# Altium PCB nrf_400708.PcbDoc (part 3 of 6)
Units mm, origin at the board's own origin, x right, y up, seen from the top; angles counter-clockwise.
Board outline 117 x 63.5 mm, 4 copper layers (Top Layer, Mid-Layer 1, Mid-Layer 2, Bottom Layer), stack 1.556 mm thick; 226 components, 168 nets, 912 pads, 2002 vias.
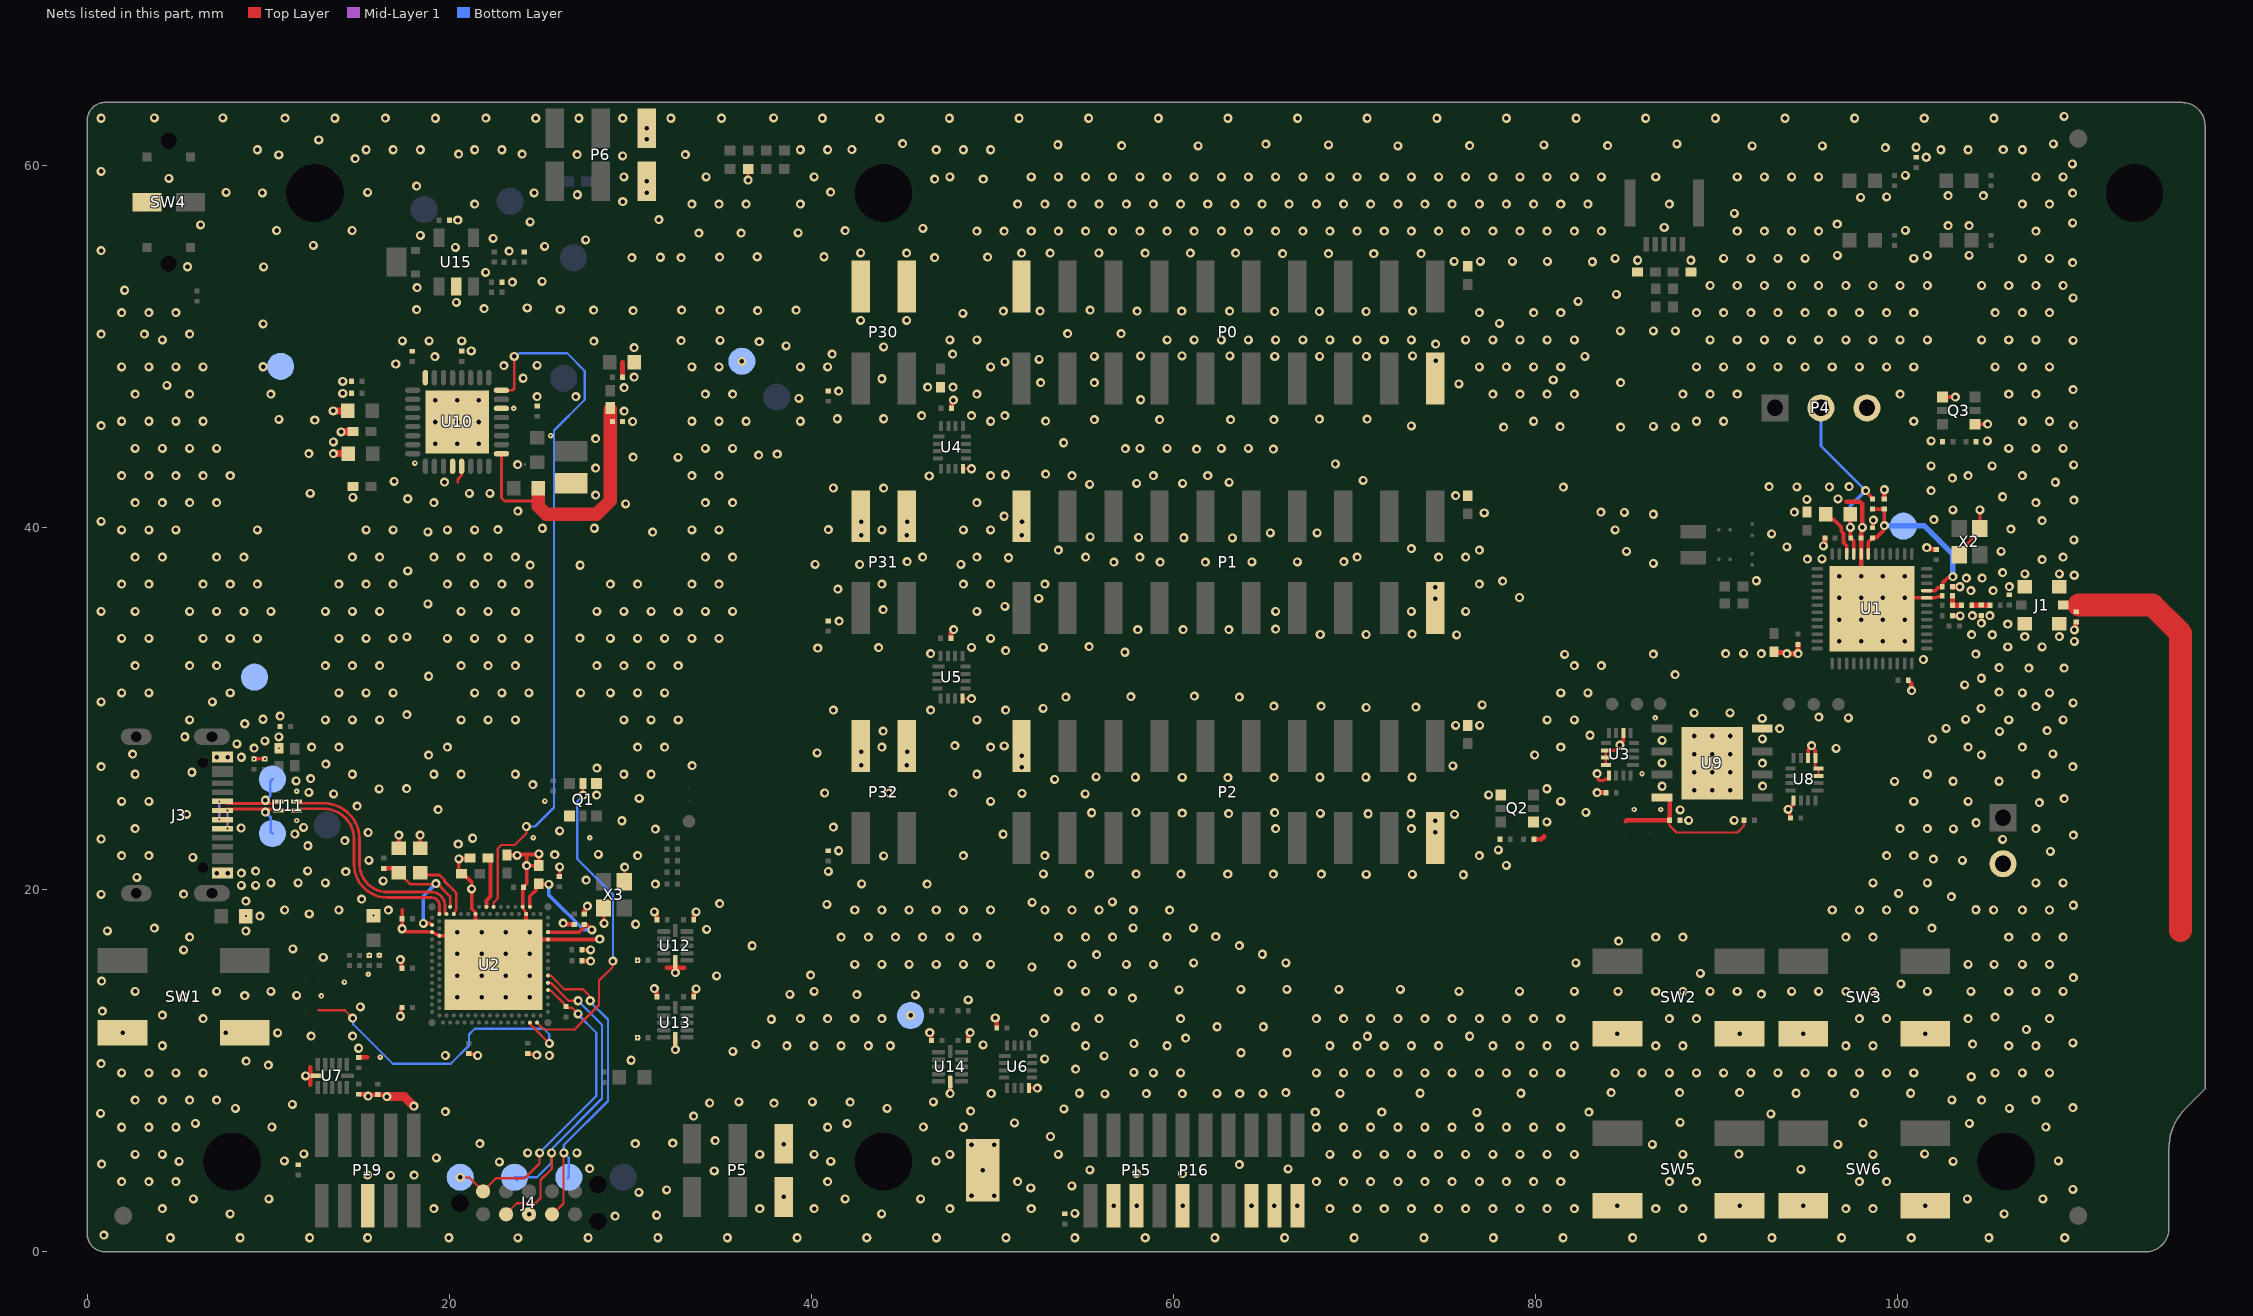
[diagram p4: the nets of this part, all layers, seen from the top]

## Part data (continued)
L3 L4: library part L0201-3n5-HQ-Murata, "Inductor, 500mA, ±0.1ｎH, 170mOhm", Manufacturer=Murata, Manufacturer Part Number=LQP03HQ3N5B02, Part number IPS=N.A., Part number NEMS=100300222, Supplier Part Number 1=490-13925-1-ND, Artikkelnr Noca=N.A., Author=rsk, Component Class=Inductors, Component Status=Active, ComponentLink1Description=Datasheet, ComponentLink1URL=https://search.murata.co.jp/Ceramy/image/img/P02/JELF243C-0021.pdf, ComponentLink2Description="Supplier link", ComponentLink2URL=N.A., Footprint Doc=0201, HelpURL=https://psearch.en.murata.com/inductor/product/LQP03HQ3N5B02%23.html, LatestRevisionDate=2018-10-23, Note="-55°C ~ 125°C", Pad Count=2, Part Number=L0201-3n5-HQ-Murata, Part number Norautron=N.A., PartId=100300222, Published=2018-10-23, Supplier 1=Digi-Key, Supplier 2=N.A., Supplier Part Number 2=N.A.
L8: library part L0806-2µ2-2500mA-73mOhm-CIGT201610EH2R2MNE, "Inductor, Irms=2.5A, Isat=2.9A, ±20%, DCR=73mΩ", Manufacturer="Samsung Electro-Mechanics America", Manufacturer Part Number=CIGT201610EH2R2MNE, Part number IPS=N.A., Part number NEMS=100300400, Part number Norautron=26521789, Supplier Part Number 1=1276-6901-1-ND, Artikkelnr Noca=N.A., Author=rsk, Component Class=Inductors, Component Status=Active, ComponentLink1Description=Datasheet, ComponentLink1URL=https://media.digikey.com/pdf/Data%20Sheets/Samsung%20PDFs/CIGT201610EH2R2MNE_Spec.pdf, ComponentLink2Description="Supplier link", ComponentLink2URL=https://www.digikey.com/en/products/detail/samsung-electro-mechanics/CIGT201610EH2R2MNE/7041223?s=N4IgTCBcDaIMIEkDiAVMAGAjANk%2BgogBJgBKYAsgHL4gC6AvkA, Footprint Doc=0806, HelpURL=http://product.samsungsem.com/pi/CIGT201610EH2R2MN.do, LatestRevisionDate=2022-09-07, Note="Unshielded Thin Film Inductor", Pad Count=2, Part Number=L0806-2µ2-2500mA-73mOhm-CIGT201610EH2R2MNE, PartId=100300400, Published=2021-02-03, Supplier 1=Digi-Key, Supplier 2=Mouser, Supplier Part Number 2=187-CIGT201610EH2R2M
LABEL1: library part Label_12x12, "PCA version label, stick-on, 12x12mm", Manufacturer="Ellco Etikett", Manufacturer Part Number=A33512‐01, Part number IPS=N.A., Part number NEMS=101200028, Artikkelnr Noca=N.A., Author=hany, Component Class=Mechanicals, Component Status=Active, ComponentLink1Description=Datasheet, ComponentLink1URL=N.A., ComponentLink2Description="Supplier link", ComponentLink2URL=N.A., Footprint Doc=Label, HelpURL=N.A., LatestRevisionDate=2023-01-05, Note=N.A., Pad Count=0, Part Number=Label_12x12, Part number Norautron=N.A., PartId=101200028, Published=2023-01-05, Supplier 1=N.A., Supplier 2=N.A., Supplier Part Number 1=N.A., Supplier Part Number 2=N.A.
LD1 LD2 LD3 LD4 LD5: library part "VS 25C7M5", "LED, Green, 0603, 573nm, Vf=2.0V, 24mcd, - 40 to +85°C", Manufacturer="Victory Electronics", Part number IPS="00000001274, 00000009961", Part number NEMS=101400097, Part number Norautron=26313411, Supplier Part Number 1=N.A., Artikkelnr Noca=13019193, Author=rsk, Component Class=Optoelectronics, Component Status=Active, ComponentLink1Description=Datasheet, ComponentLink1URL=N.A., ComponentLink2Description="Supplier link", ComponentLink2URL=N.A., Footprint Doc=0603, HelpURL="\\hizz\pro\app9717\Datasheet\optoelectronics\Victory Electronics\VS 25C7M5.pdf", LatestRevisionDate=2020-10-23, Manufacturer Part Number="VS 25C7M5", Note=N.A., Pad Count=2, Part Number="VS 25C7M5", PartId=101400097, Published=2017-08-21, Supplier 1="EC Partner", Supplier 2=N.A., Supplier Part Number 2=N.A.
LOGO1: library part "Nordic Logo lying", "Nordic logo lying", Manufacturer=N.A., Part number NEMS=101100001, Artikkelnr Noca=N.A., Author=rsk, Component Class=Markings, Component Status=Active, ComponentLink1Description=Datasheet, ComponentLink1URL=N.A., ComponentLink2Description="Supplier link", ComponentLink2URL=N.A., Footprint Doc="Nordic Logo", HelpURL=N.A., LatestRevisionDate=2017-03-20, Manufacturer Part Number=N.A., Note=N.A., Pad Count=0, Part Number="Nordic Logo lying", Part number IPS=N.A., Part number Norautron=N.A., PartId=101100001, Published=2017-09-01, Supplier 1=N.A., Supplier 2=N.A., Supplier Part Number 1=N.A., Supplier Part Number 2=N.A.
LOGO2: library part "WEEE Symbol 3x4.5mm", "WEEE Directive symbol", Manufacturer=N.A., Part number NEMS=101100006, Artikkelnr Noca=N.A., Author=rsk, Component Class=Markings, Component Status=Active, ComponentLink1Description=Datasheet, ComponentLink1URL=N.A., ComponentLink2Description="Supplier link", ComponentLink2URL=N.A., Footprint Doc=WEE_3x4.5mm, HelpURL=N.A., LatestRevisionDate=2023-03-07, Manufacturer Part Number=N.A., Note=N.A., Pad Count=0, Part Number="WEEE Symbol 3x4.5mm", Part number IPS=N.A., Part number Norautron=N.A., PartId=101100006, Published=2016-09-07, Supplier 1=N.A., Supplier 2=N.A., Supplier Part Number 1=N.A., Supplier Part Number 2=N.A.
LOGO3: "Segger logo, small size", Manufacturer=N.A., Part number NEMS=101100004, Artikkelnr Noca=N.A., Author=rsk, Component Class=Markings, Component Status=Active, ComponentLink1Description=Datasheet, ComponentLink1URL=N.A., ComponentLink2Description="Supplier link", ComponentLink2URL=N.A., Footprint Doc="Segger Logo S", HelpURL=N.A., LatestRevisionDate=2016-09-07, Manufacturer Part Number=N.A., Note=N.A., Pad Count=0, Part Number="Segger Logo S", Part number IPS=N.A., Part number Norautron=N.A., PartId=101100004, Published=2016-09-07, Supplier 1=N.A., Supplier 2=N.A., Supplier Part Number 1=N.A., Supplier Part Number 2=N.A.
LOGO4: library part CE_logo, "CE (Conformité_Européenne) logo", Manufacturer=N.A., Part number NEMS=101100010, Artikkelnr Noca=N.A., Author=daba, Component Class=Markings, Component Status=Active, ComponentLink1Description=Datasheet, ComponentLink1URL=N.A., ComponentLink2Description="Supplier link", ComponentLink2URL=N.A., Footprint Doc=CE_logo, HelpURL=N.A., LatestRevisionDate=2024-11-26, Manufacturer Part Number=N.A., Note=N.A., Pad Count=0, Part Number=CE_logo, Part number IPS=N.A., Part number Norautron=N.A., PartId=101100010, Published=2024-11-26, Supplier 1=N.A., Supplier 2=N.A., Supplier Part Number 1=N.A., Supplier Part Number 2=N.A.
NT2: library part "2 pin starpoint", "Starpoint", Manufacturer=N.A., Part number NEMS=100500603, Artikkelnr Noca=N.A., Author=rsk, Component Class=Connectors, Component Status=Active, ComponentLink1Description=Datasheet, ComponentLink1URL=N.A., ComponentLink2Description="Supplier link", ComponentLink2URL=N.A., Footprint Doc=N.A., HelpURL=N.A., LatestRevisionDate=2017-08-31, Manufacturer Part Number=N.A., Note="Net tie", Pad Count=2, Part Number="2 pin starpoint", Part number IPS=N.A., Part number Norautron=N.A., PartId=100500603, Published=2017-08-31, Supplier 1=N.A., Supplier 2=N.A., Supplier Part Number 1=N.A., Supplier Part Number 2=N.A., System=Connector
P0 P1 P2: library part "Pin Header 2x10 SMD, 2.54mm", "Pin Header 2x10, 2.54mm (100mil) SMD", Manufacturer=WCON, Manufacturer Part Number=1125-1210S0M116CR09, Part number IPS=N.A., Part number NEMS=100500738, Artikkelnr Noca=N.A., Author=stl1, Component Class=Connectors, Component Status=Active, ComponentLink1Description=Datasheet, ComponentLink1URL=https://suddendocs.samtec.com/catalog_english/tsm.pdf, ComponentLink2Description="Supplier link", ComponentLink2URL=https://www.digikey.no/en/products/detail/samtec-inc/TSM-110-02-S-DV/6679037, Footprint Doc=HDR_2x10-SMD-2.54MM, HelpURL=https://www.samtec.com/products/tsm-110-02-s-dv, LatestRevisionDate=2024-02-21, Note=SMD, Pad Count=20, Part Number="Pin Header 2x10 SMD, 2.54mm", Part number Norautron=N.A., PartId=100500738, Published=2022-01-24, Supplier 1=Cabcon, Supplier 2=Samtec, Supplier Part Number 1=1125-1210S0M116CR09, Supplier Part Number 2=TSM-110-02-S-DV, System=Connector
P3: "Pin List 1x2, 2.54mm (100mil)", Manufacturer=N.A., Part number NEMS=100500297, Artikkelnr Noca=56019040, Author=rsk, Component Class=Connectors, Component Status=Active, ComponentLink1Description=Datasheet, ComponentLink1URL=N.A., ComponentLink2Description="Supplier link", ComponentLink2URL=N.A., Footprint Doc=LIST_1x2, HelpURL=N.A., LatestRevisionDate=2009-12-12, Manufacturer Part Number=N.A., Note=N.A., Pad Count=2, Part Number="Pin List 1x2", Part number IPS=N.A., Part number Norautron=N.A., PartId=100500297, Published=2009-12-12, Supplier 1=N.A., Supplier 2=N.A., Supplier Part Number 1=N.A., Supplier Part Number 2=N.A., System=Connector
P4: "Pin List 1x3, 2.54mm (100mil)", Manufacturer=N.A., Part number NEMS=100500304, Artikkelnr Noca=56019041, Author=rsk, Component Class=Connectors, Component Status=Active, ComponentLink1Description=Datasheet, ComponentLink1URL=N.A., ComponentLink2Description="Supplier link", ComponentLink2URL=N.A., Footprint Doc=LIST_1x3, HelpURL=N.A., LatestRevisionDate=2009-12-12, Manufacturer Part Number=N.A., Note=N.A., Pad Count=3, Part Number="Pin List 1x3", Part number IPS=N.A., Part number Norautron=N.A., PartId=100500304, Published=2009-12-12, Supplier 1=N.A., Supplier 2=N.A., Supplier Part Number 1=N.A., Supplier Part Number 2=N.A., System=Connector
P5 P6: library part "Pin List 1x3 SMD", "Pin List 1x3, 2.54mm (100mil), SMD", Manufacturer=WCON, Manufacturer Part Number=1125-1103S0M116CR04, Part number IPS=N.A., Part number NEMS=100500306, Part number Norautron=26470016, Artikkelnr Noca=N.A., Author=rsk, Component Class=Connectors, Component Status=Active, ComponentLink1Description=Datasheet, ComponentLink1URL=N.A., ComponentLink2Description="Supplier link", ComponentLink2URL=N.A., Footprint Doc=LIST_1x3_SMD, HelpURL=N.A., LatestRevisionDate=2021-09-24, Note=N.A., Pad Count=3, Part Number="Pin List 1x3 SMD", PartId=100500306, Published=2013-10-21, Supplier 1=Cabcon, Supplier 2=Samtec, Supplier Part Number 1=1125-1103S0M116CR04, Supplier Part Number 2=TSM-103-01-L-SV-P-TR, System=Connector
P15 P19: library part "Pin Header 2x5 SMD, 1.27mm, KS", "Pin Header 2x5, 1.27mm (50mil), SMD, Keying Shroud", Manufacturer=WCON, Manufacturer Part Number=3132-10MS0BK00R5, Part number IPS=N.A., Part number NEMS=100500261, Artikkelnr Noca=N.A., Author=rsk, Component Class=Connectors, Component Status=Active, ComponentLink1Description=Datasheet, ComponentLink1URL=N.A., ComponentLink2Description="Supplier link", ComponentLink2URL=N.A., Footprint Doc=HDR_2x5-SMD-1.27mm, HelpURL=\\hizz\pro\app9717\Datasheet\connectors\W-CON\3132-XXMXXBK00XX.pdf, LatestRevisionDate=2024-02-02, Note="(Replaced 3132-10MS0BK00R1)", Pad Count=10, Part Number="Pin Header 2x5 SMD, 1.27mm, KS", Part number Norautron=N.A., PartId=100500261, Published=2016-01-22, Supplier 1=Cabcon, Supplier 2=N.A., Supplier Part Number 1=3132-10MS0BK00R5, Supplier Part Number 2=N.A., System=Connector
P16: library part "Pin Header 2x10 SMD, 1.27mm, KS, N.C.", "Pin Header 2x10, 1.27mm (50mil), SMD, Keying Shroud", Manufacturer=WCON, Manufacturer Part Number=3132-20MS0BK00R1, Part number IPS=N.A., Part number NEMS=100500279, Artikkelnr Noca=N.A., Author=rsk, Component Class=Connectors, Component Status=Active, ComponentLink1Description=Datasheet, ComponentLink1URL=N.A., ComponentLink2Description="Supplier link", ComponentLink2URL=N.A., Footprint Doc=HDR_2x10-SMD-1.27mm, HelpURL=N.A., LatestRevisionDate=2017-10-23, Note=N.A., Pad Count=20, Part Number="Pin Header 2x10 SMD, 1.27mm, KS, N.C.", Part number Norautron=N.A., PartId=100500279, Published=2017-09-07, Supplier 1=Cabcon, Supplier 2=Digi-Key, Supplier Part Number 1=3132-20MS0BK00R1, Supplier Part Number 2=FTSH-110-01-F-DV-K-ND, System=Connector
P30 P31 P32: "Pin Header 2x2, SMD, 2.54mm (100mil)", Manufacturer=WCON, Manufacturer Part Number=1125-1202S0M116CR03, Part number IPS=N.A., Part number NEMS=100500770, Artikkelnr Noca=N.A., Author=stl1, Component Class=Connectors, Component Status=Active, ComponentLink1Description=Datasheet, ComponentLink1URL=N.A., ComponentLink2Description="Supplier link", ComponentLink2URL=N.A., Footprint Doc=HDR_2x2-SMD, HelpURL=N.A., LatestRevisionDate=2024-02-21, Note=N.A., Pad Count=4, Part Number="Pin Header 2x2 SMD", Part number Norautron=N.A., PartId=100500770, Published=2022-10-28, Supplier 1=Cabcon, Supplier 2=Samtec, Supplier Part Number 1=1125-1202S0M116CR03, Supplier Part Number 2=TSM-102-02-S-DV, System=Connector
Q1 Q2 Q3: "MOSFET 2N-CH 60V 0.17A TSSOP6 (SOT363)", Manufacturer=Nexperia, Manufacturer Part Number=NX138AKSX, Part number IPS=N.A., Part number NEMS=101300207, Supplier Part Number 1=1727-2732-2-ND, Artikkelnr Noca=N.A., Author=stl1, Component Class=Semiconductors, Component Status=Active, ComponentLink1Description=Datasheet, ComponentLink1URL=https://assets.nexperia.com/documents/data-sheet/NX138AKS.pdf, ComponentLink2Description="Supplier link", ComponentLink2URL=N.A., Footprint Doc=TSSOP6, HelpURL=N.A., LatestRevisionDate=2023-11-20, Note=N.A., Pad Count=6, Part Number=NX138AKS, Part number Norautron=N.A., PartId=101300207, Published=2023-11-20, Supplier 1=Digi-Key, Supplier 2=Mouser, Supplier Part Number 2=771-NX138AKSX
Q4: library part PBSS4330PA,115, "30V, 3A, 2.1W, G=270, NPN Transistor", Manufacturer=Nexperia, Part number IPS=N.A., Part number NEMS=101300184, Supplier Part Number 1=1727-5112-1-ND‎, Artikkelnr Noca=N.A., Author=rubr, Component Class=Semiconductors, Component Status=Active, ComponentLink1Description=Datasheet, ComponentLink1URL=https://assets.nexperia.com/documents/data-sheet/PBSS4330PA.pdf, ComponentLink2Description="Supplier link", ComponentLink2URL=https://www.digikey.com/en/products/detail/nexperia-usa-inc/PBSS4330PA-115/2296330, Footprint Doc="HUSON-3 (2x2)", HelpURL=https://www.nexperia.com/products/bipolar-transistors/general-purpose-and-low-vcesat-bipolar-transistors/single-bipolar-transistors/single-bipolar-transistors-100-v/PBSS4330PA.html, LatestRevisionDate=2021-06-03, Manufacturer Part Number=PBSS4330PA,115, Note=N.A., Pad Count=3, Part Number=PBSS4330PA,115, Part number Norautron=N.A., PartId=101300184, Published=2021-06-03, Supplier 1=Digi-Key, Supplier 2=N.A., Supplier Part Number 2=N.A.
R1 R2 R19 R20: library part R0201-680, "Resistor, ±1%, 0.05W", Manufacturer=N.A., Part number NEMS=100100040, Artikkelnr Noca=N.A., Author=rsk, Component Class=Resistors, Component Status=Active, ComponentLink1Description=Datasheet, ComponentLink1URL=N.A., ComponentLink2Description="Supplier link", ComponentLink2URL=N.A., Footprint Doc=0201, HelpURL=N.A., LatestRevisionDate=2014-11-13, Manufacturer Part Number=N.A., Note="Chip Res 1%", Pad Count=2, Part Number=R0201-680, Part number IPS=N.A., Part number Norautron=N.A., PartId=100100040, Published=2014-11-13, Supplier 1=N.A., Supplier 2=N.A., Supplier Part Number 1=N.A., Supplier Part Number 2=N.A.
R3 R9 R38: library part R0201-0R, "Resistor, ±5%, 0.05W", Manufacturer=N.A., Part number IPS=00000003245, Part number NEMS=100100001, Artikkelnr Noca=N.A., Author=rsk, Component Class=Resistors, Component Status=Active, ComponentLink1Description=Datasheet, ComponentLink1URL=N.A., ComponentLink2Description="Supplier link", ComponentLink2URL=N.A., Footprint Doc=0201, HelpURL=N.A., LatestRevisionDate=2017-11-09, Manufacturer Part Number=N.A., Note="Chip Res 5%", Pad Count=2, Part Number=R0201-0R, Part number Norautron=N.A., PartId=100100001, Published=2014-11-13, Supplier 1=N.A., Supplier 2=N.A., Supplier Part Number 1=N.A., Supplier Part Number 2=N.A.
R4 R37 R41 R42: library part R0201-10k, "Resistor, ±1%, 0.05W", Manufacturer=N.A., Part number IPS=00000001255, Part number NEMS=100100065, Part number Norautron=26107101, Artikkelnr Noca=N.A., Author=rsk, Component Class=Resistors, Component Status=Active, ComponentLink1Description=Datasheet, ComponentLink1URL=N.A., ComponentLink2Description="Supplier link", ComponentLink2URL=N.A., Footprint Doc=0201, HelpURL=N.A., LatestRevisionDate=2014-11-13, Manufacturer Part Number=N.A., Note="Chip Res 1%", Pad Count=2, Part Number=R0201-10k, PartId=100100065, Published=2014-11-13, Supplier 1=N.A., Supplier 2=N.A., Supplier Part Number 1=N.A., Supplier Part Number 2=N.A.
R5: library part R0201-560, "Resistor, ±1%, 0.05W", Manufacturer=N.A., Part number NEMS=100100038, Artikkelnr Noca=N.A., Author=rsk, Component Class=Resistors, Component Status=Active, ComponentLink1Description=Datasheet, ComponentLink1URL=N.A., ComponentLink2Description="Supplier link", ComponentLink2URL=N.A., Footprint Doc=0201, HelpURL=N.A., LatestRevisionDate=2014-11-13, Manufacturer Part Number=N.A., Note="Chip Res 1%", Pad Count=2, Part Number=R0201-560, Part number IPS=N.A., Part number Norautron=N.A., PartId=100100038, Published=2014-11-13, Supplier 1=N.A., Supplier 2=N.A., Supplier Part Number 1=N.A., Supplier Part Number 2=N.A.
R6 R8 R13 R14 R15 R16 R17 R23 R31 R32 R35 R39 R56: library part R0201-100k, "Resistor, ±1%, 0.05W", Manufacturer=N.A., Part number IPS=00000001419, Part number NEMS=100100080, Part number Norautron=26108487, Artikkelnr Noca=N.A., Author=rsk, Component Class=Resistors, Component Status=Active, ComponentLink1Description=Datasheet, ComponentLink1URL=N.A., ComponentLink2Description="Supplier link", ComponentLink2URL=N.A., Footprint Doc=0201, HelpURL=N.A., LatestRevisionDate=2014-11-13, Manufacturer Part Number=N.A., Note="Chip Res 1%", Pad Count=2, Part Number=R0201-100k, PartId=100100080, Published=2014-11-13, Supplier 1=N.A., Supplier 2=N.A., Supplier Part Number 1=N.A., Supplier Part Number 2=N.A.
R7: library part R0201-47R, "Resistor, ±1%, 0.05W", Manufacturer=N.A., Part number IPS=00000004794, Part number NEMS=100100022, Part number Norautron=26108300, Artikkelnr Noca=N.A., Author=rsk, Component Class=Resistors, Component Status=Active, ComponentLink1Description=Datasheet, ComponentLink1URL=N.A., ComponentLink2Description="Supplier link", ComponentLink2URL=N.A., Footprint Doc=0201, HelpURL=N.A., LatestRevisionDate=2014-11-13, Manufacturer Part Number=N.A., Note="Chip Res 1%", Pad Count=2, Part Number=R0201-47R, PartId=100100022, Published=2014-11-13, Supplier 1=N.A., Supplier 2=N.A., Supplier Part Number 1=N.A., Supplier Part Number 2=N.A.
R10 R11 R12 R18 R27: library part R0201-1M0, "Resistor, ±1%, 0.05W", Manufacturer=N.A., Part number IPS=00000001418, Part number NEMS=100100093, Part number Norautron=26107108, Artikkelnr Noca=N.A., Author=rsk, Component Class=Resistors, Component Status=Active, ComponentLink1Description=Datasheet, ComponentLink1URL=N.A., ComponentLink2Description="Supplier link", ComponentLink2URL=N.A., Footprint Doc=0201, HelpURL=N.A., LatestRevisionDate=2014-11-13, Manufacturer Part Number=N.A., Note="Chip Res 1%", Pad Count=2, Part Number=R0201-1M0, PartId=100100093, Published=2014-11-13, Supplier 1=N.A., Supplier 2=N.A., Supplier Part Number 1=N.A., Supplier Part Number 2=N.A.
R21 R22 R25 R28 R29 R30 R33 R34: library part R0402-0R, "Resistor, ±5%, 0.063W", Manufacturer=N.A., Part number IPS=00000007128, Part number NEMS=100100109, Supplier Part Number 1=146-9661, Artikkelnr Noca=27049000, Author=rsk, Component Class=Resistors, Component Status=Active, ComponentLink1Description=Datasheet, ComponentLink1URL=N.A., ComponentLink2Description="Supplier link", ComponentLink2URL=N.A., Footprint Doc=0402, HelpURL=N.A., LatestRevisionDate=2009-11-23, Manufacturer Part Number=N.A., Note="Chip Res 5%", Pad Count=2, Part Number=R0402-0R, Part number Norautron=N.A., PartId=100100109, Published=2009-05-08, Supplier 1=Farnell, Supplier 2=N.A., Supplier Part Number 2=N.A.
R24: library part R0402-TBD, "Chip Res 0402", Manufacturer=N.A., Part number NEMS=100100282, Artikkelnr Noca=N.A., Author=rsk, Component Class=Resistors, Component Status=Active, ComponentLink1Description=Datasheet, ComponentLink1URL=N.A., ComponentLink2Description="Supplier link", ComponentLink2URL=N.A., Footprint Doc=0402, HelpURL=N.A., LatestRevisionDate=2010-12-21, Manufacturer Part Number=N.A., Note="Chip Res", Pad Count=2, Part Number=R0402-TBD, Part number IPS=N.A., Part number Norautron=N.A., PartId=100100282, Published=2010-12-21, Supplier 1=N.A., Supplier 2=N.A., Supplier Part Number 1=N.A., Supplier Part Number 2=N.A.
R26: library part R0201-47k, "Resistor, ±1%, 0.05W", Manufacturer=N.A., Part number IPS=00000001423, Part number NEMS=100100076, Artikkelnr Noca=N.A., Author=rsk, Component Class=Resistors, Component Status=Active, ComponentLink1Description=Datasheet, ComponentLink1URL=N.A., ComponentLink2Description="Supplier link", ComponentLink2URL=N.A., Footprint Doc=0201, HelpURL=N.A., LatestRevisionDate=2014-11-13, Manufacturer Part Number=N.A., Note="Chip Res 1%", Pad Count=2, Part Number=R0201-47k, Part number Norautron=N.A., PartId=100100076, Published=2014-11-13, Supplier 1=N.A., Supplier 2=N.A., Supplier Part Number 1=N.A., Supplier Part Number 2=N.A.
R36: library part R0201-1k0, "Resistor, ±1%, 0.05W", Manufacturer=N.A., Part number IPS=00000005786, Part number NEMS=100100043, Artikkelnr Noca=N.A., Author=rsk, Component Class=Resistors, Component Status=Active, ComponentLink1Description=Datasheet, ComponentLink1URL=N.A., ComponentLink2Description="Supplier link", ComponentLink2URL=N.A., Footprint Doc=0201, HelpURL=N.A., LatestRevisionDate=2014-11-13, Manufacturer Part Number=N.A., Note="Chip Res 1%", Pad Count=2, Part Number=R0201-1k0, Part number Norautron=N.A., PartId=100100043, Published=2014-11-13, Supplier 1=N.A., Supplier 2=N.A., Supplier Part Number 1=N.A., Supplier Part Number 2=N.A.
R40: library part R0201-2R2, "Resistor, ±1%, 0.05W", Manufacturer=N.A., Part number NEMS=100100006, Part number Norautron=26470029, Artikkelnr Noca=N.A., Author=rsk, Component Class=Resistors, Component Status=Active, ComponentLink1Description=Datasheet, ComponentLink1URL=N.A., ComponentLink2Description="Supplier link", ComponentLink2URL=N.A., Footprint Doc=0201, HelpURL=N.A., LatestRevisionDate=2014-11-13, Manufacturer Part Number=N.A., Note="Chip Res 1%", Pad Count=2, Part Number=R0201-2R2, Part number IPS=N.A., PartId=100100006, Published=2014-11-13, Supplier 1=N.A., Supplier 2=N.A., Supplier Part Number 1=N.A., Supplier Part Number 2=N.A.
R43: library part R0201-33k, "Resistor, ±1%, 0.05W", Manufacturer=N.A., Part number IPS=00000001708, Part number NEMS=100100073, Artikkelnr Noca=N.A., Author=rsk, Component Class=Resistors, Component Status=Active, ComponentLink1Description=Datasheet, ComponentLink1URL=N.A., ComponentLink2Description="Supplier link", ComponentLink2URL=N.A., Footprint Doc=0201, HelpURL=N.A., LatestRevisionDate=2014-11-13, Manufacturer Part Number=N.A., Note="Chip Res 1%", Pad Count=2, Part Number=R0201-33k, Part number Norautron=N.A., PartId=100100073, Published=2014-11-13, Supplier 1=N.A., Supplier 2=N.A., Supplier Part Number 1=N.A., Supplier Part Number 2=N.A.
S1: "Giteki symbol", Manufacturer=N.A., Part number NEMS=101100011, Artikkelnr Noca=N.A., Author=getr, Component Class=Markings, Component Status=Active, ComponentLink1Description=Datasheet, ComponentLink1URL=N.A., ComponentLink2Description="Supplier link", ComponentLink2URL=N.A., Footprint Doc="Giteki Symbol", HelpURL=N.A., LatestRevisionDate=2025-02-28, Manufacturer Part Number=N.A., Note=N.A., Pad Count=0, Part Number="Giteki Symbol", Part number IPS=N.A., Part number Norautron=N.A., PartId=101100011, Published=2025-02-28, Supplier 1=N.A., Supplier 2=N.A., Supplier Part Number 1=N.A., Supplier Part Number 2=N.A.
SB1 SB8 SB10: Manufacturer=N.A., Part number NEMS=100500458, Artikkelnr Noca=N.A., Author=rsk, Component Class=Connectors, Component Status=Active, ComponentLink1Description=Datasheet, ComponentLink1URL=N.A., ComponentLink2Description="Supplier link", ComponentLink2URL=N.A., Footprint Doc=Solderbridge, HelpURL=N.A., LatestRevisionDate=2009-12-14, Manufacturer Part Number=N.A., Note=N.A., Pad Count=2, Part Number=Solderbridge, Part number IPS=N.A., Part number Norautron=N.A., PartId=100500458, Published=2009-12-14, Supplier 1=N.A., Supplier 2=N.A., Supplier Part Number 1=N.A., Supplier Part Number 2=N.A., System=Connector
SB2 SB9 SB11: library part "Solderbridge Shorted", "Shorted Solderbridge", Manufacturer=N.A., Part number NEMS=100500459, Artikkelnr Noca=N.A., Author=rsk, Component Class=Connectors, Component Status=Active, ComponentLink1Description=Datasheet, ComponentLink1URL=N.A., ComponentLink2Description="Supplier link", ComponentLink2URL=N.A., Footprint Doc=Solderbridge_Shorted, HelpURL=N.A., LatestRevisionDate=2012-08-07, Manufacturer Part Number=N.A., Note=N.A., Pad Count=2, Part Number="Solderbridge Shorted", Part number IPS=N.A., Part number Norautron=N.A., PartId=100500459, Published=2012-08-07, Supplier 1=N.A., Supplier 2=N.A., Supplier Part Number 1=N.A., Supplier Part Number 2=N.A., System=Connector
SB3 SB4: library part "Solderbridge Shorted 0.4mm", "Shorted Solderbridge", Manufacturer=N.A., Part number NEMS=100500561, Artikkelnr Noca=N.A., Author=rsk, Component Class=Connectors, Component Status=Active, ComponentLink1Description=Datasheet, ComponentLink1URL=N.A., ComponentLink2Description="Supplier link", ComponentLink2URL=N.A., Footprint Doc=Solderbridge_Shorted, HelpURL=N.A., LatestRevisionDate=2012-08-07, Manufacturer Part Number=N.A., Note=N.A., Pad Count=2, Part Number="Solderbridge Shorted 0.4mm", Part number IPS=N.A., Part number Norautron=N.A., PartId=100500561, Published=2012-08-07, Supplier 1=N.A., Supplier 2=N.A., Supplier Part Number 1=N.A., Supplier Part Number 2=N.A., System=Connector
SB5 SB6: library part "Solderbridge 0.4mm", Manufacturer=N.A., Part number NEMS=100500560, Artikkelnr Noca=N.A., Author=rsk, Component Class=Connectors, Component Status=Active, ComponentLink1Description=Datasheet, ComponentLink1URL=N.A., ComponentLink2Description="Supplier link", ComponentLink2URL=N.A., Footprint Doc=Solderbridge, HelpURL=N.A., LatestRevisionDate=2009-12-14, Manufacturer Part Number=N.A., Note=N.A., Pad Count=2, Part Number="Solderbridge 0.4mm", Part number IPS=N.A., Part number Norautron=N.A., PartId=100500560, Published=2009-12-14, Supplier 1=N.A., Supplier 2=N.A., Supplier Part Number 1=N.A., Supplier Part Number 2=N.A., System=Connector
SW1 SW2 SW3 SW5 SW6: library part Switch-PB-6.2x6.3mm-SMD, "Tactile Switch, SPNO, SMD, 160gf, 6.2x6.3x2.5mm", Manufacturer=Dailywell, Manufacturer Part Number=TS604VM1-025BR-R, Part number IPS=00000007812, Part number NEMS="101500001, 101500133", Part number Norautron=N.A., Artikkelnr Noca=50019106, Author=rsk, Component Class=Switches, Component Status=Active, ComponentLink1Description=Datasheet, ComponentLink1URL=N.A., ComponentLink2Description="Supplier link", ComponentLink2URL=N.A., Footprint Doc=Switch-PB-6.2x6.3mm-SMD, HelpURL=\\hizz\pro\app9717\Datasheet\switches\Dailywell\TS604VM1-025BR-R.pdf, LatestRevisionDate=2016-04-21, Note=N.A., Pad Count=4, Part Number=Switch-PB-6.2x6.3mm-SMD, PartId=101500001, Published=2010-02-01, Supplier 1=Cabcon, Supplier 2=Mouser, Supplier Part Number 1=TS604VM1-025BR-R, Supplier Part Number 2=688-SKHUALE010
SW4: library part Switch-Slide-RA-J-Lead-DPDT-8.5x3.5mm_C&K, "SMD slide Switch (ON-ON)", Manufacturer=C&K, Manufacturer Part Number=JS202011JAQN, Part number IPS=00000007811, Part number NEMS=101500037, Part number Norautron=N.A., Supplier Part Number 1=CKN10722CT-ND, Artikkelnr Noca=N.A., Author=rsk, Component Class=Switches, Component Status=Active, ComponentLink1Description=Datasheet, ComponentLink1URL=N.A., ComponentLink2Description="Supplier link", ComponentLink2URL=N.A., Footprint Doc=Switch-Slide-RA-J-Lead-DPDT-8.5x3.5mm, HelpURL=http://www.ck-components.com/media/1422/js.pdf, LatestRevisionDate=2017-02-01, Note=N.A., Pad Count=6, Part Number=Switch-Slide-RA-J-Lead-DPDT-8.5x3.5mm_C&K, PartId=101500037, Published=2016-09-15, Supplier 1=Digi-Key, Supplier 2=Mouser, Supplier Part Number 2=611-JS202011JAQN
TP1 TP2 TP3 TP4 TP5 TP6 TP8 TP9 TP10 TP11 TP12 TP13 TP14 TP15 TP16 TP17 TP18: library part TP_SMD_Ø1.5MM, "1.5mm circular SMD testpad", Manufacturer="Nordic Semiconductor", Manufacturer Part Number=N.A., Part number NEMS=100500477, Artikkelnr Noca=N.A., Author=rsk, Component Class=Connectors, Component Status=Active, ComponentLink1Description=Datasheet, ComponentLink1URL=N.A., ComponentLink2Description="Supplier link", ComponentLink2URL=N.A., Footprint Doc=TP_SMD_Ø1.5mm, HelpURL=N.A., LatestRevisionDate=2021-03-05, Note=N.A., Pad Count=1, Part Number=TP_SMD_Ø1.5MM, Part number IPS=N.A., Part number Norautron=N.A., PartId=100500477, Published=2016-06-02, Supplier 1=N.A., Supplier 2=N.A., Supplier Part Number 1=N.A., Supplier Part Number 2=N.A.
TP7 TP19 TP20 TP21 TP23 TP24 TP25: library part TP_SMD_Ø0.7MM, "0.7mm circular SMD testpad", Manufacturer="Nordic Semiconductor", Manufacturer Part Number=N.A., Part number NEMS=100500474, Artikkelnr Noca=N.A., Author=rsk, Component Class=Connectors, Component Status=Active, ComponentLink1Description=Datasheet, ComponentLink1URL=N.A., ComponentLink2Description="Supplier link", ComponentLink2URL=N.A., Footprint Doc=TP_SMD_Ø0.7mm, HelpURL=N.A., LatestRevisionDate=2021-03-05, Note=N.A., Pad Count=1, Part Number=TP_SMD_Ø0.7MM, Part number IPS=N.A., Part number Norautron=N.A., PartId=100500474, Published=2017-12-14, Supplier 1=N.A., Supplier 2=N.A., Supplier Part Number 1=N.A., Supplier Part Number 2=N.A.
TP22: library part "TP - S1751-46R", "PC TEST POINT TIN SMD L", Manufacturer=Harwin, Manufacturer Part Number=S1751-46R, Part number IPS=N.A., Part number NEMS=100500525, Supplier Part Number 1=952-1478-1-ND, Artikkelnr Noca=N.A., Author=rsk, Component Class=Connectors, Component Status=Active, ComponentLink1Description=Datasheet, ComponentLink1URL=N.A., ComponentLink2Description="Supplier link", ComponentLink2URL=N.A., Footprint Doc="Harwin S1751-46R", HelpURL=http://cdn.harwin.com/pdfs/S1751.pdf, LatestRevisionDate=2015-05-29, Note=N.A., Pad Count=1, Part Number="TP - S1751-46R", Part number Norautron=N.A., PartId=100500525, Published=2015-05-29, Supplier 1=Digi-Key, Supplier 2=N.A., Supplier Part Number 2=N.A.
U1: library part nRF54L15-QFAAC00, "Multi-protocol Bluetooth Low Energy, IEEE 802.15.4 and 2.4GHz proprietary Wireless MCU", Manufacturer="Nordic Semiconductor", Part number IPS=N.A., Part number NEMS=102000382, Artikkelnr Noca=N.A., Author=stl1, Component Class=Nordic_Devices, Component Status=Active, ComponentLink1Description=Datasheet, ComponentLink1URL=N.A., ComponentLink2Description="Supplier link", ComponentLink2URL=N.A., Footprint Doc=QFN-48, HelpURL=N.A., LatestRevisionDate=2025-01-30, Manufacturer Part Number=nRF54L15-QFAAC00, Note=N.A., Pad Count=49, Part Number=nRF54L15-QFAAC00, Part number Norautron=N.A., PartId=102000382, Published=2025-01-30, Supplier 1="Nordic Semiconductor", Supplier 2=N.A., Supplier Part Number 1=nRF54L15-QFAAC00, Supplier Part Number 2=N.A.
U2: library part nRF5340-QKAAD0, "Multi-protocol Bluetooth Low Energy, IEEE 802.15.4, ANT and 2.4GHz proprietary system-on-chip", Manufacturer="Nordic Semiconductor", Part number IPS=N.A., Part number NEMS=102000216, Part number Norautron=NOD26470035, Artikkelnr Noca=N.A., Author=rsk, Component Class=Nordic_Devices, Component Status=Active, ComponentLink1Description=Datasheet, ComponentLink1URL=N.A., ComponentLink2Description="Supplier link", ComponentLink2URL=N.A., Footprint Doc=AQFN-98, HelpURL=N.A., LatestRevisionDate=2020-12-02, Manufacturer Part Number=nRF5340-QKAAD0, Note=N.A., Pad Count=98, Part Number=nRF5340-QKAAD0, PartId=102000216, Published=2020-12-02, Supplier 1="Nordic Semiconductor", Supplier 2=N.A., Supplier Part Number 1=nRF5340-QKAAD0, Supplier Part Number 2=N.A.
U3 U8: "Low-Capacitance, 2:1 (SPDT) 4-Channel, analog switch", Manufacturer="Texas Instruments", Manufacturer Part Number=TMUX1574RSVR, Part number IPS=N.A., Part number NEMS=101900850, Supplier Part Number 1=296-53445-2-ND, Artikkelnr Noca=N.A., Author=stl1, Component Class=Misc_ICs, Component Status=Active, ComponentLink1Description=Datasheet, ComponentLink1URL=https://www.ti.com/lit/ds/symlink/tmux1574.pdf?ts=1730869182960, ComponentLink2Description="Supplier link", ComponentLink2URL=N.A., Footprint Doc=UFQFN-16, HelpURL=https://www.ti.com/lit/ds/symlink/tmux1574.pdf?ts=1730869182960, LatestRevisionDate=2024-11-20, Note=N.A., Pad Count=16, Part Number=TMUX1574, Part number Norautron=N.A., PartId=101900850, Published=2024-11-20, Supplier 1=Digi-Key, Supplier 2=Mouser, Supplier Part Number 2=595-TMUX1574RSVR
U4 U5 U6: "Low-Capacitance, 1:1 (SPST) 4-Channel, analog switch", Manufacturer="Texas Instruments", Manufacturer Part Number=TMUX1511RSVR, Part number IPS=N.A., Part number NEMS=101900847, Supplier Part Number 1=296-53443-2-ND, Artikkelnr Noca=N.A., Author=stl1, Component Class=Misc_ICs, Component Status=Active, ComponentLink1Description=Datasheet, ComponentLink1URL=https://www.ti.com/lit/ds/symlink/tmux1511.pdf?ts=1730882090102&ref_url=https%253A%252F%252Fwww.mouser.dk%252F, ComponentLink2Description="Supplier link", ComponentLink2URL=N.A., Footprint Doc=UFQFN-16, HelpURL=https://www.ti.com/lit/ds/symlink/tmux1511.pdf?ts=1730882090102&ref_url=https%253A%252F%252Fwww.mouser.dk%252F, LatestRevisionDate=2024-12-05, Note=N.A., Pad Count=16, Part Number=TMUX1511, Part number Norautron=N.A., PartId=101900847, Published=2024-12-05, Supplier 1=Digi-Key, Supplier 2=Mouser, Supplier Part Number 2=595-TMUX1511RSVR
U7 U12 U13 U14: library part TXB0104RUTR, "4-Bit Bidirectional Level-Shifter/Voltage Translator with Automatic Direction Sensing", Manufacturer="Texas Instruments", Part number IPS=N.A., Part number NEMS=101900856, Supplier Part Number 1=296-25888-2-ND, Artikkelnr Noca=N.A., Author=stl1, Component Class=Misc_ICs, Component Status=Active, ComponentLink1Description=Datasheet, ComponentLink1URL=N.A., ComponentLink2Description="Supplier link", ComponentLink2URL=N.A., Footprint Doc=12-UFQFN, HelpURL=https://www.ti.com/lit/ds/symlink/txb0104.pdf?ts=1738584719537&ref_url=https%253A%252F%252Fwww.mouser.com%252F, LatestRevisionDate=2025-02-04, Manufacturer Part Number=TXB0104RUTR, Note="Translator, Bidirectional", Pad Count=12, Part Number=TXB0104RUTR, Part number Norautron=N.A., PartId=101900856, Published=2025-02-04, Supplier 1=Digi-Key, Supplier 2=Mouser, Supplier Part Number 2=595-TXB0104RUTR
U9: library part MX25R6435FZNIL0, "Ultra low power, 64M-bit, serial multi I/O flash memory", Manufacturer=Macronix, Part number IPS=00000004370, Part number NEMS=101900438, Part number Norautron=N.A., Artikkelnr Noca=15020015, Author=rsk, Component Class=Misc_ICs, Component Status=Active, ComponentLink1Description=Datasheet, ComponentLink1URL=N.A., ComponentLink2Description="Supplier link", ComponentLink2URL=N.A., Footprint Doc=WSON-8, HelpURL=https://www.macronix.com/Lists/Datasheet/Attachments/7913/MX25R6435F,%20Wide%20Range,%2064Mb,%20v1.5.pdf, LatestRevisionDate=2021-02-26, Manufacturer Part Number=MX25R6435FZNIL0, Note=N.A., Pad Count=8, Part Number=MX25R6435FZNIL0, PartId=101900438, Published=2016-06-29, Supplier 1=Future, Supplier 2=Arrow, Supplier Part Number 1=MX25R6435FZNIL0, Supplier Part Number 2=MX25R6435FZNIL0
U10: "Li-Ion/Li-Polymer USB-C battery charger with high efficiency buck regulators, LDOs or load switches, LED drivers, TWI and VBUSOUT", Manufacturer="Nordic Semiconductor", Part number IPS=N.A., Part number NEMS=102000306, Artikkelnr Noca=N.A., Author=eisk, Component Class=Nordic_Devices, Component Status=Active, ComponentLink1Description=Datasheet, ComponentLink1URL=N.A., ComponentLink2Description="Supplier link", ComponentLink2URL=N.A., Footprint Doc=QFN-32, HelpURL=N.A., LatestRevisionDate=2023-08-16, Manufacturer Part Number=nPM1300-QEAAC0, Note="Production version", Pad Count=33, Part Number=nPM1300-QEAAC0, Part number Norautron=N.A., PartId=102000306, Published=2023-08-16, Supplier 1="Nordic Semiconductor", Supplier 2=N.A., Supplier Part Number 1=nPM1300-QEAAC0, Supplier Part Number 2=N.A.
U11: "2 Line Common mode filter with ESD protection for USB 2.0 interface", Manufacturer=STMicroelectronics, Part number IPS=N.A., Part number NEMS=100800034, Supplier Part Number 1=497-13420-2-ND, Artikkelnr Noca=N.A., Author=eisk, Component Class=Filters, Component Status=Active, ComponentLink1Description=Datasheet, ComponentLink1URL=https://www.st.com/content/ccc/resource/technical/document/datasheet/group3/1c/93/cf/72/85/cf/4d/d6/DM00039389/files/DM00039389.pdf/jcr:content/translations/en.DM00039389.pdf, ComponentLink2Description="Supplier link", ComponentLink2URL=https://www.digikey.com/en/products/detail/stmicroelectronics/ECMF02-4CMX8/3770020, Footprint Doc=UFDFN-8, HelpURL=https://www.st.com/content/ccc/resource/technical/document/datasheet/group3/1c/93/cf/72/85/cf/4d/d6/DM00039389/files/DM00039389.pdf/jcr:content/translations/en.DM00039389.pdf, LatestRevisionDate=2024-01-31, Manufacturer Part Number=ECMF02-4CMX8, Note=N.A., Pad Count=8, Part Number=ECMF02-4CMX8, Part number Norautron=N.A., PartId=100800034, Published=2024-01-31, Supplier 1=Digi-Key, Supplier 2=Mouser, Supplier Part Number 2=511-ECMF02-4CMX8
U15: library part TLV271CW5-7, "Dual rail to rail CMOS Amplifier", Manufacturer="Diodes Incorporated", Part number IPS=N.A., Part number NEMS=101900398, Supplier Part Number 1=TLV271CW5-7DICT-ND, Artikkelnr Noca=N.A., Author=rsk, Component Class=Misc_ICs, Component Status=Active, ComponentLink1Description=Datasheet, ComponentLink1URL=N.A., ComponentLink2Description="Supplier link", ComponentLink2URL=N.A., Footprint Doc=SOT-25, HelpURL=http://www.diodes.com/_files/datasheets/TLV27x.pdf, LatestRevisionDate=2016-04-05, Manufacturer Part Number=TLV271CW5-7, Note=N.A., Pad Count=5, Part Number=TLV271CW5-7, Part number Norautron=N.A., PartId=101900398, Published=2016-04-05, Supplier 1=Digi-Key, Supplier 2=N.A., Supplier Part Number 2=N.A.
X1: library part XTAL_SMD2012_32.768kHz_9pF_TXC, "XTAL SMD 2012, 32.768kHz, 9pF, ±20ppm", Manufacturer="TXC Corporation", Manufacturer Part Number=9HT11-32.768KDZC-T, Part number IPS=N.A., Part number NEMS=101600107, Supplier Part Number 1=887-1426-2-ND, Artikkelnr Noca=N.A., Author=eisk, Component Class=Oscillators, Component Status=Active, ComponentLink1Description=Datasheet, ComponentLink1URL=http://www.txccrystal.com/images/pdf/9ht11.pdf, ComponentLink2Description="Supplier link", ComponentLink2URL=https://www.digikey.com/en/products/detail/9HT11-32.768KDZC-T/887-1426-1-ND/2403277, Footprint Doc=XTAL_2012, HelpURL=http://www.txccrystal.com/images/pdf/9ht11.pdf, LatestRevisionDate=2023-03-14, Note="XTAL SMD 32.768kHz", Pad Count=2, Part Number=XTAL_SMD2012_32.768kHz_9pF_TXC, Part number Norautron=N.A., PartId=101600107, Published=2014-03-28, Supplier 1=Digi-Key, Supplier 2=Mouser, Supplier Part Number 2=717-9HT11-32.7KDZC-T
X2 X3: library part XTAL_SMD2016_32MHz_8pF_Golledge, "XTAL SMD 2016, 32MHz, Cl=8pF, Tol: ±10ppm, Stab: ±15ppm", Manufacturer=Golledge, Manufacturer Part Number=MP06003, Part number IPS=00000001431, Part number NEMS=101600041, Part number Norautron=N.A., Artikkelnr Noca=22010050, Author=rsk, Component Class=Oscillators, Component Status=Active, ComponentLink1Description=Datasheet, ComponentLink1URL=N.A., ComponentLink2Description="Supplier link", ComponentLink2URL=N.A., Footprint Doc=XTAL_2016, HelpURL=\\hizz\pro\app9717\Datasheet\crystals\Golledge\mp06003.pdf, LatestRevisionDate=2016-11-02, Note="XTAL SMD 32.000MHz", Pad Count=4, Part Number=XTAL_SMD2016_32MHz_8pF_Golledge, PartId=101600041, Published=2016-11-02, Supplier 1="Link Nordic", Supplier 2=N.A., Supplier Part Number 1=N.A., Supplier Part Number 2=N.A.

## Free pads (board coordinates)
  round 3.2 hole 3.2 unplated: 1(8.004,5) 1(12.604,58.5) 1(44.004,5) 1(44.004,58.5) 1(106.004,5) 1(113.104,58.5)

## Via types
v1: diameter 0.5, hole 0.25, Top Layer to Bottom Layer, tented both sides, 1905 vias
v2: diameter 0.3, hole 0.1, Top Layer to Mid-Layer 1, tented top, 77 vias
v3: diameter 0.3, hole 0.1, Top Layer to Mid-Layer 1, tented both sides, 20 vias

## Nets (pads, with @x,y where several pads share a name; then routed paths per layer and width w, separated by ;. In a path a pad name is that pad's centre, name@x,y a point inside that pad or via, vN(x,y) a via of type N, cw(c..) or ccw(c..) an arc to the next point about the centre after c; other vN are vias at no path point)
ANT: C38.2 J1.3 | length 22.7
  Top Layer w1.27: 110.033,35.73 114.1,35.73 115.66,34.171 115.66,17.748
DBGR'_N: J3.A7 J3.B7 TP17.1 U11.2 | length 5.5
  Top Layer w0.153: J3.B7@7.489,24.875 ccw(c7.727,25.113) 7.727,24.776 10.322,24.776 ccw(c10.322,25.141) U11.2@10.579,24.883
  Mid-Layer 1 w0.127: v2(7.3,23.884) v2(7.3,24.884)
  Bottom Layer w0.153: v1(9.85,24.95) 10.125,25.225 10.125,26 TP17.1@10.24,26.115
DBGR'_P: J3.A6 J3.B6 TP18.1 U11.3 | length 5.5
  Top Layer w0.153: J3.A6@7.489,24.375 cw(c7.727,24.137) 7.727,24.473 10.361,24.473 cw(c10.361,24.165) U11.3@10.579,24.383
  Mid-Layer 1 w0.127: v2(7.763,23.385) v2@7.763,24.374
  Bottom Layer w0.153: v1(9.85,24.3) 10.147,24.003 10.147,23.206 TP18.1@10.24,23.113
  other v2: 7.763,24.385
DBGR_BUTTON: SB2.2 U2.AL27 | length 17.6
  Top Layer w0.125: SB2.2@12.8,13.364 12.815,13.35 14.237,13.35 v1(14.675,12.912) ; U2.AL27@24.46,12.664 24.46,12.637 24.51,12.587 24.51,12.555 24.631,12.434 24.631,12.427 v1(25.54,11.518)
  Top Layer w0.15: U2.AL27@24.46,12.622 U2.AL27@24.46,12.637
  Bottom Layer w0.125: v1(14.675,12.912) 14.703,12.884 14.703,12.572 16.888,10.387 20.087,10.387 21.1,11.4 21.1,12.009 21.416,12.325 25.244,12.325 25.54,12.03 v1(25.54,11.518)
DBGR_LED: Q1.2 U2.AL29 | length 17.5
  Top Layer w0.125: U2.AL29@24.86,12.664 25.237,12.288 26.938,12.288 27.124,12.474 28.286,13.636 28.286,14.986 29.023,15.723 29.023,16.037 v1(29.05,16.064) ; v1(27.401,25.234) Q1.2@27.401,25.71
  Bottom Layer w0.125: v1(27.401,25.234) 27.401,25.199 27.079,24.878 27.079,21.71 29.05,19.739 v1(29.05,16.064)
DBGR_N: U2.B4 U11.7 | length 12.6
  Top Layer w0.153: U11.7@11.579,24.883 ccw(c11.833,25.137) 11.833,24.778 13.084,24.778 cw(c13.084,22.81) 15.053,22.81 15.053,21.422 ccw(c16.6,21.422) 16.6,19.875 19.033,19.875 cw(c19.033,19.138) 19.77,19.138 19.77,18.755 ccw(c19.86,18.755) U2.B4@19.86,18.664
DBGR_P: U2.B2 U11.6 | length 12
  Top Layer w0.153: U11.6@11.579,24.383 cw(c11.801,24.161) 11.801,24.475 13.084,24.475 cw(c13.084,22.81) 14.75,22.81 14.75,21.422 ccw(c16.6,21.422) 16.6,19.572 19.033,19.572 cw(c19.033,19.138) 19.467,19.138 19.467,18.664 U2.B2@19.46,18.664
DBGR_RESET: J4.10 R6.1 TP4.1 U2.AC31 | length 17.6
  Top Layer w0.125: v1(20.616,4.115) 21.107,4.115 J4.10@21.878,3.344 22.609,4.075 24.2,4.075 25.001,4.876 v1(25.001,5.475) ; U2.AC31@25.46,14.464 25.479,14.445 25.616,14.445 26.372,13.689 26.372,13.628 26.517,13.483 26.792,13.483 v1(27.125,13.15)
  Bottom Layer w0.125: v1(25.001,5.475) 28.132,8.606 28.132,12.107 27.125,13.114 v1(27.125,13.15)
DBGR_SWDCLK: J4.4 TP6.1 U2.W31 | length 18
  Top Layer w0.125: U2.W31@25.46,15.264 25.471,15.254 25.624,15.254 26.363,14.515 27.124,14.515 27.393,14.515 27.732,14.176 27.732,13.943 v1(27.8,13.875) ; J4.4@25.688,2.074 25.724,2.074 26.324,2.674 26.324,5.459 v1(26.34,5.475)
  Bottom Layer w0.125: TP6.1@26.558,4.067 TP6.1@26.564,4.062 ; TP6.1@26.616,4.125 26.616,5.198 v1(26.34,5.475) 26.34,5.903 28.775,8.339 28.775,12.832 27.8,13.808 v1(27.8,13.875)
DBGR_SWDIO: J4.2 TP5.1 U2.AA31 | length 20.4
  Top Layer w0.125: J4.2@23.148,2.074 23.148,2.099 23.74,2.69 24.771,2.69 25.053,2.972 25.053,3.968 25.667,4.582 v1(25.667,5.475) ; U2.AA31@25.46,14.864 25.471,14.854 25.624,14.854 26.603,13.875 v1(27.125,13.875)
  Bottom Layer w0.125: TP5.1@23.616,4.125 24.851,4.125 25.667,4.94 v1(25.667,5.475) 25.738,5.547 25.738,5.76 28.452,8.473 28.452,12.548 v1(27.125,13.875)
  Bottom Layer w0.15: TP5.1@23.616,4.115 TP5.1@23.759,3.972
DCC: L1.2 U1.46 | length 2.8
  Top Layer w0.2: L1.2@96.053,40.758 96.053,40.733 96.328,40.458 96.496,40.458 96.906,40.048 96.906,39.818 97.033,39.691 97.033,39.186 97.205,39.014 U1.46@97.205,38.555
DECD: C1.2 FB1.1 L1.1 P4.2 U1.45 | length 10.9
  Top Layer w0.2: L1.1@97.414,40.798 v1(97.414,40.022) 97.414,39.46 C1.2@97.435,39.439 97.435,39.424 97.47,39.389 97.485,39.389 97.605,39.269 97.605,38.78 U1.45@97.605,38.555 ; v1(98.25,42.05) 98.25,42.024 98.583,41.691 98.583,41.637 FB1.1@98.637,41.637
  Bottom Layer w0.15: P4.2@95.785,46.625 95.785,44.515 v1(98.25,42.05)
  Bottom Layer w0.2: v1(97.414,40.022) 97.414,41.214 v1(98.25,42.05)
DECRF: C2.2 C5.2 C12.1 FB1.2 TP2.1 U1.33 U1.43 | length 11.2
  Top Layer w0.2: U1.43@98.405,38.555 98.405,39.204 98.668,39.467 98.856,39.467 99.236,39.847 99.236,40.066 v1(99.294,40.123) C2.2@99.294,41.032 FB1.2@98.633,41.032 ; U1.33@101.63,36.53 102.093,36.53 102.263,36.7 102.453,36.7 102.488,36.735 102.488,36.745 102.523,36.78 102.523,36.975 102.795,37.246 103.021,37.246 v1(103.078,37.304)
  Bottom Layer w0.15: TP2.1@100.252,40.123 TP2.1@100.273,40.144
  Bottom Layer w0.3: v1(99.294,40.123) 100.252,40.123 101.478,40.123 103.078,38.523 v1(103.078,37.304)
GND: C1.1 C2.1 C3.1 C4.2 C5.1 C6.1 C7.2 C8.2 C9.1 C10.2 C11.2 C12.2 C13.2 C14.2 C15.2 C16.1 C17.2 C18.2 C19.1 C20.2 C21.2 C22.2 C23.1 C25.1 C26.1 C28.1 C29.2 C30.2 C31.2 C32.1 C33.2 C34.2 C35.2 C36.2 C37.2 C38.1 C39.1 C40.2 C41.1 C42.2 C43.2 C44.2 C45.1 C46.1 C47.1 C48.1 C49.2 C50.1 C51.1 C52.1 C53.1 C54.2 C55.1 C56.1 C57.1 C58.2 C59.2 C60.2 C61.1 C62.1 C63.1 C64.1 C65.2 C66.2 C67.2 C68.1 C69.2 C70.1 C72.2 C73.1 C74.2 C75.2 C76.2 C77.2 C78.2 C79.2 J1.2 J3.A1 J3.A12 J4.3 NT2.1 P0.2 P0.19 P1.2 P1.19 P2.2 P2.19 P3.2 P4.3 P5.1 P6.1 P15.3 P15.5 P15.9 P16.3 P16.5 P16.9 P16.15 P16.17 P16.19 P19.5 P30.2 P30.4 P31.2 P31.4 P32.2 P32.4 Q1.1 Q1.4 Q2.1 Q2.4 Q3.1 Q3.4 R4.1 R7.2 R10.2 R11.2 R12.2 R18.1 R26.2 R27.2 R30.2 R32.2 R37.1 R42.1 R56.2 SW1.1 SW2.1 SW3.1 SW4.2 SW5.1 SW6.1 TP12.1 TP13.1 TP14.1 TP15.1 TP22.1 U1.32 U1.44 U1.49 U2.104 U2.A25 U2.B12 U2.B26 U2.G1 U2.H2 U2.J31 U3.6 U3.10 U3.11 U3.12 U3.13 U4.8 U5.8 U6.8 U7.6 U8.3 U8.4 U8.5 U8.6 U8.13 U9.4 U9.9 U10.6 U10.16 U10.28 U10.29 U10.33 U11.5 U11.8 U12.6 U13.6 U14.6 U15.2 X2.2 X2.4 X3.2 X3.4 | length 75.6
  Top Layer w0.125: C65.2@83.9,25.385 C65.2@83.905,25.39 ; U3.10@83.9,27.7 U3.11@83.9,27.3 U3.12@83.9,26.9 84.028,26.9 U3.12@84.075,26.853 ; U8.5@95.475,27.275 95.475,26.747 95.522,26.7 U8.4@95.65,26.7 U8.3@95.65,26.3
  Top Layer w0.15: U10.16@18.678,48.31 U10.16@18.692,48.296 ; 20.478,42.525 20.478,42.678 20.691,42.891 U10.29@20.692,43.396 ; C37.2@26.096,20.744 26.103,20.751 26.103,21.258 v1(26.11,21.265) ; X3.4@28.534,18.99 28.56,18.965 v1(28.56,18.147) ; X3.2@29.677,20.448 29.7,20.471 v1(29.7,21.258) ; v1(36.525,59.207) R30.2@36.525,59.83 ; U5.8@48.36,30.561 v1(48.86,30.561) ; U4.8@48.378,43.262 v1(48.86,43.262) ; U6.8@52.025,9.05 v1(52.496,9.05) ; v1(83.425,26.425) 83.472,26.378 83.472,26.1 83.53,26.042 83.792,26.042 83.875,26.125 84.04,26.125 84.075,26.16 U3.13@84.075,26.325 ; U3.10@83.9,27.7 84.375,27.7 v1(84.675,28) ; X2.4@103.418,38.509 103.768,38.859 103.768,39.026 104.218,39.476 104.218,39.609 X2.2@104.568,39.959 ; X2.2@104.568,39.934 X2.2@104.568,39.959 ; v1(104.568,40.987) X2.2@104.568,39.959
  Top Layer w0.165: U2.A25@24.06,19.064 U2.B26@24.26,18.664
  Top Layer w0.187: U2.G1@19.06,17.664 U2.H2@19.46,17.464 U2.104@20.16,17.464 ; v1(21.245,20.052) 21.245,18.96 21.453,18.752 21.453,18.672 U2.B12@21.46,18.664
  Top Layer w0.188: 18.183,17.694 18.832,17.694 18.856,17.669 19.055,17.669 U2.G1@19.06,17.664
  Top Layer w0.2: v3(9.225,27.235) v3(9.825,27.235) ; C42.2@17.231,22.302 v1(17.231,23.024) ; v1(17.308,13.017) 17.365,13.074 17.365,13.436 C20.2@17.428,13.499 ; v1(17.313,16.149) 17.369,16.094 17.369,15.659 C18.2@17.404,15.624 ; 17.404,18.9 17.404,18.864 C13.2@17.404,18.401 v1(17.404,17.853) 17.485,17.853 17.644,17.694 18.183,17.694 ; C43.2@18.4,22.302 v1(18.4,23.025) ; v1@20.529,21.735 20.529,21.041 20.679,20.891 C45.1@20.694,20.891 ; v1(20.538,21.706) 20.562,21.73 21.236,21.73 C39.1@21.262,21.756 ; C45.1@20.719,20.916 20.894,20.741 20.932,20.741 21.243,20.429 21.243,20.054 v1(21.245,20.052) ; C22.2@21.092,10.954 21.127,10.919 21.431,10.919 21.5,10.85 v1(21.581,10.85) ; U2.A25@24.06,19.064 24.06,19.987 24.085,20.012 24.085,20.134 24.285,20.334 v1(24.285,21.34) ; 24.262,21.951 24.285,21.929 v1(24.285,21.34) ; C34.2@24.343,10.954 24.378,10.919 24.806,10.919 v1(24.85,10.875) ; v1(24.96,21.988) 24.957,21.984 24.957,21.343 C32.1@24.953,21.34 v1(24.285,21.34) ; Q1.1@27.964,25.91 28.158,25.716 Q1.1@28.164,25.716 ; v1(84.675,28) 84.675,28.05 84.875,28.25 U3.6@84.875,28.675 ; C66.2@94.1,23.971 94.065,24.006 94.065,24.273 93.978,24.359 v1(93.978,24.44) 94.265,24.727 94.265,24.915 U8.13@94.275,24.925 ; U8.6@95.075,27.275 95.075,27.715 v1@95.275,27.915 ; v1(95.275,27.965) v1@95.275,27.915 ; U8.5@95.475,27.275 95.475,27.715 v1@95.275,27.915 ; C12.2@98.633,40.002 98.659,40.027 98.659,40.403 v1(98.684,40.428) ; U1.49@100.443,36.13 U1.32@101.63,36.13 102.06,36.13 C6.1@102.487,36.244 ; Q3.1@102.5,47.225 v1(103.216,47.225) ; Q3.4@104.3,45.725 v1@105.016,45.725
  Top Layer w0.203: R7.2@27.345,16.687 v1(27.823,16.687) ; C35.2@27.353,16.078 27.36,16.071 27.816,16.071 v1(27.823,16.064)
  Top Layer w0.225: U2.104@21.46,17.264 U2.B12@21.46,18.664 ; C31.2@23.15,21.905 C31.2@23.16,21.915 ; C31.2@23.211,21.915 23.751,21.915 v1(23.759,21.907) 23.804,21.951 24.262,21.951 24.924,21.951 v1(24.96,21.988) ; U2.B26@24.26,18.664 24.26,17.264 28.314,17.264 v1(28.325,17.275) ; C33.2@27.459,18.661 27.474,18.661 27.496,18.683 27.496,18.879 27.644,19.027 v1(27.644,19.101)